# Altium PCB BetaBake_REV_1.0.PcbDoc (part 8 of 8)
Units mil, origin at the board's own origin, x right, y up, seen from the top; angles counter-clockwise.
Board outline 6000 x 4000 mil, 8 copper layers (USB 2.0 (90 Diff) DDR3 Data (50-100), GND (Top Layer high-speed return paths), DDR3 Fly-by Routing (Address, Command, Control), QSPI Flash (Clk, IO), Int4 PWR, Int5 GND (Shielding between L4 and L6), Int6 eMMC High-Speed Data Lines (8-bit bus), SDIO/peripherals, Int7 GND, Escapes, non-critical tracks, decoupling capacitor vias), stack 60.424 mil thick; 426 components, 331 nets, 1941 pads, 428 vias.
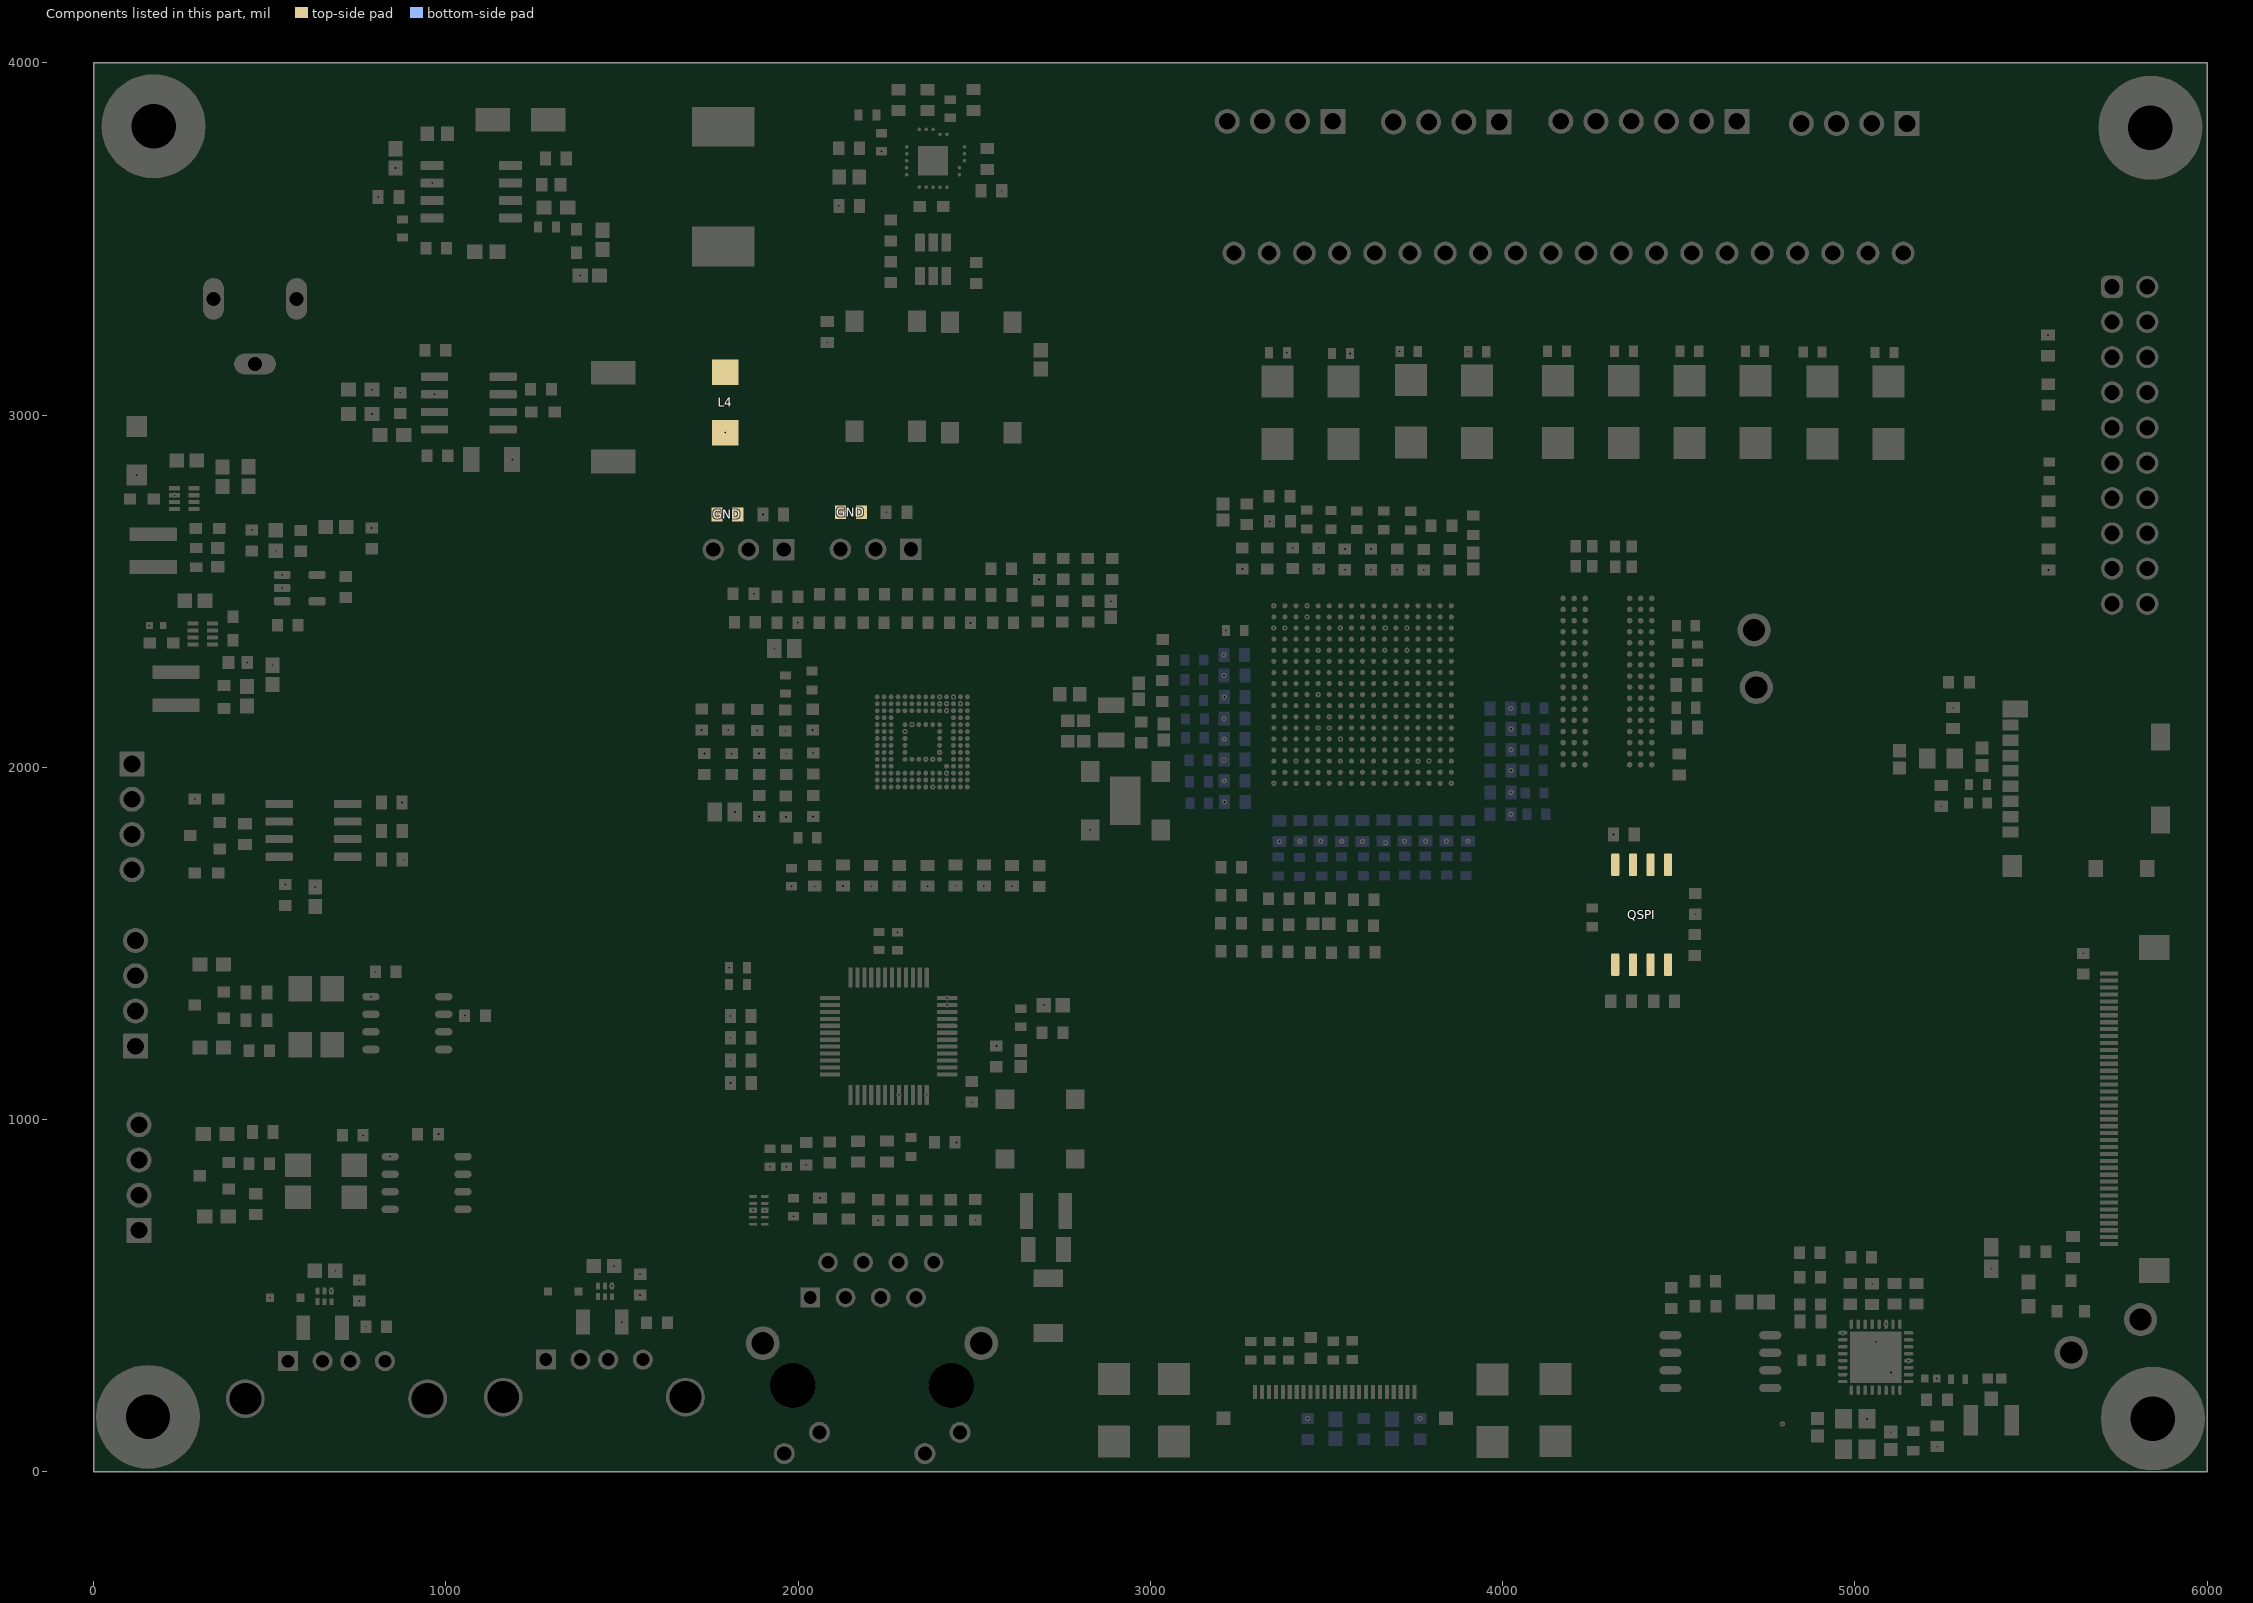
[diagram p13: the components of this part, seen from the top]

## Polygon pours and split planes (outlines as drawn) (continued)
DRAM_1V35 on Int4 PWR "DRAM_1V35_L04_P064" (solid, remove dead copper, pour order 64): 768.02,2833.3 784.02,2817.3 784.02,2739.47 856.86,2739.47 865.02,2731.3 865.02,2653.3 773.31,2653.3 708.16,2588.15 433.17,2588.15 432.02,2589.3 432.02,2512.3 65.01,2512.3 60.01,2517.3 60.01,2877.62 158.44,2877.62 158.44,2796.96 134.82,2773.34 138.02,2770.13 138.02,2597.3 139.61,2598.89 378.02,2598.89 378.02,2609.3 401.43,2632.71 677.43,2632.71 688.02,2643.3 688.02,2765.3 687.02,2766.3 685.72,2765 332.28,2765 332.28,2830.56 335.02,2833.3
AVDD on Int4 PWR "AVDD_L04_P061" (solid, remove dead copper, pour order 61): 3324,291.92 3868,296 3868,75.3 3854.7,62 3324,62
NVCC_CSI on Int4 PWR "NVCC_CSI_L04_P060" (solid, remove dead copper, pour order 60): 2135,3821 2080.04,3821 2619,3821 2619,3559 2614.63,3554.63 2080.04,3554.63 2080.04,3808.04 2080.04,3821
NVCC_CSI on Int4 PWR "NVCC_CSI_L04_P053" (solid, remove dead copper, pour order 53): 469,2504.33 469,2567 476,2574 561,2574 575,2560 575,2445 574.28,2445 551,2421.72 551,2357 486,2357 480,2363 480,2461 393.73,2461 309.73,2377 227.92,2377 227.92,2501.25
VDD_OTG2_VBUS on Int4 PWR "VDD_OTG2_VBUS_L04_P058" (solid, remove dead copper, pour order 58): 654.96,617 789.92,617 823.92,583 823.92,519 807.92,503 692.08,503 654.96,540.12
VDD_OTG1_VBUS on Int4 PWR "VDD_OTG1_VBUS_L04_P057" (solid, remove dead copper, pour order 57): 1631,628 1631,526 1512,526 1483.96,554.04 1449,554.04 1449,623 1454,628
NVCC_CSI on Int4 PWR "NVCC_CSI_L04_P055" (solid, remove dead copper, pour order 55): 243,1954 244,1953 931,1953 931,1439.32 849,1357.32 849,953 931,871 931,717 879,665 691,665 642,714 642,1087 723,1168 723,1591 673.45,1640.55 246.54,1640.55 243,1644.09
Vin on Int4 PWR "VIN_L04_P014" (solid, remove dead copper, pour order 14): 482.28,3740.16 1033.46,3740.16 1033.46,2962.6 482.28,2962.6
VDD_SOC_IN on Int4 PWR "VDD_SOC_IN_L04_P052" (solid, remove dead copper, pour order 52): 125,2422 174.43,2422 177.68,2418.75 177.68,2381.32 193,2366 193,2327 356.28,2327 356.28,2272 409.95,2272 409.95,2327 549,2327 549,2258 544.42,2262.58 406.75,2262.58 406.75,2202 464.65,2202 464.65,2136 151,2136 151,2205 398.15,2200 398.15,2248.98 261.34,2312 125,2312
DRAM_1V35 on Int4 PWR "DRAM_1V35_L04_P020" (solid, remove dead copper, pour order 20): 2644,2560 2840,2560 2853.7,2546.3 2853.7,2507.95 2925.05,2507.95 2931,2502 2931,2457 2922.66,2448.66 2662.62,2448.66 2644,2467.28
VCCQ_1V8 on Int4 PWR "VCCQ_1V8_L04_P025" (solid, remove dead copper, pour order 25): 1963.28,1688 2631.64,1686.36 2636,1686.35 2636,1627 1955,1627 1955,1679.72
AVDD on Int4 PWR "AVDD_L04_P029" (solid, remove dead copper, pour order 29): 1836.86,1333.54 1837.33,1333.06 1837.33,1064.8 1772.37,1064.8 1778.22,1070.65 1778.22,1333.54
Vout on Int4 PWR "VOUT_L04_P038" (solid, remove dead copper, pour order 38): 661.42,468 1664,468 1664,362.2 661.42,362.2
VDD_SOC_IN on Int4 PWR "VDD_SOC_IN_L04_P044" (solid, remove dead copper, pour order 44): 3555.12,2255.91 3622.05,2255.91 3622.05,2153.18 3555,2153.18 3555,2255.79
GND on USB 2.0 (90 Diff) DDR3 Data (50-100) "GND_L01_P070" (solid, pour order 70): 25,3970 6000,3970 6000,0 -26,0 17,43 17,3975
GND on Escapes, non-critical tracks, decoupling capacitor vias "GND_L08_P074" (solid, pour order 74): 25,3970 5975,3970 5975,27 5961,41 17.83,41 17.83,3962.83
GND on Int5 GND (Shielding between L4 and L6) "GND_L05_P084" (solid, remove dead copper, pour order 84): 25,3975 5975,3975 6000,3950 5975,3925 5975,50 25,50 25,4000
GND on Int6 eMMC High-Speed Data Lines (8-bit bus), SDIO/peripherals "GND_L06_P085" (solid, pour order 85): 5950,3975 5961,3964 5961,41 16,41 -25,0 -25,3975
GND on DDR3 Fly-by Routing (Address, Command, Control), QSPI Flash (Clk, IO) "GND_L03_P086" (solid, pour order 86): 0,3975 5950,3975 6000,3925 6000,0 25,0 -25,50 0,75 0,4000
GND on Int7 GND (split plane): 5979.9,20.1 20.1,20.1 20.1,3979.9 5979.9,3979.9
GND on GND (Top Layer high-speed return paths) (split plane): 5979.9,20.1 20.1,20.1 20.1,3979.9 5979.9,3979.9

## Silkscreen, mask and mechanical layers (free items; w line width, h text height)
Top Overlay:
  text "SDA2" at 3295,3677 h40 r270
  text "SCLK" at 4263,3677 h40 r270
  text "CS0" at 4363,3677 h40 r270
  text "MOSI" at 4466,3677 h40 r270
  text "MISO" at 4563,3676 h40 r270
  text "SCL2" at 3414,3674 h40 r270
  text "SDA1" at 3774,3674 h40 r270
  text "SCL1" at 3897,3673 h40 r270
  text "3V3" at 3515,3670 h40 r270
  text "3V3" at 4678,3670 h40 r270
  text "3V3" at 3987,3667 h40 r270
  text "GND" at 3206,3666 h40 r270
  text "TX" at 4928,3666 h40 r270
  text "GND" at 3670,3665 h40 r270
  text "GND" at 4140,3665 h40 r270
  text "GND" at 4813,3662 h40 r270
  text "3V3" at 5146,3661 h40 r270
  text "RX" at 5039,3660 h40 r270
  text "SCL2" at 3608,3393 h40 r270
  text "SDA1" at 3905,3391 h40 r270
  text "SCL1" at 4007,3391 h40 r270
  text "MISO" at 4614,3391 h40 r270
  text "RX" at 5021,3391 h40 r270
  text "SDA2" at 3505,3390 h40 r270
  text "SCLK" at 4310,3390 h40 r270
  text "CS0" at 4414,3390 h40 r270
  text "MOSI" at 4514,3390 h40 r270
  text "TX" at 4913,3390 h40 r270
  text "GND" at 3319,3388 h40 r270
  text "GND" at 4822,3388 h40 r270
  text "3V3" at 5128,3387 h40 r270
  text "3V3" at 3718,3386 h40 r270
  text "GND" at 3424,3385 h40 r270
  text "GND" at 3817,3385 h40 r270
  text "GND" at 4221,3385 h40 r270
  text "3V3" at 4722,3384 h40 r270
  text "GND" at 3214,3383 h40 r270
  text "GND" at 3212,3381 h40 r270
  text "3V3" at 4120,3378 h40 r270
Bottom Overlay:
  drawing of 483 lines, arcs and shapes, not listed
  text "SIG_A" at 308,1983 h30
  text "SIG_B" at 300,1879 h30
  text "GND" at 287,1791 h30
  text "GND" at 286.54,1682.28 h30
  text "GND" at 284,1484 h30
  text "GND" at 284,1382 h30
  text "LOW" at 282,1281 h30
  text "HIGH" at 286,1179 h30
  text "GND" at 278.78,958.78 h30
  text "GND" at 279,859 h30
  text "LOW" at 289,761 h30
  text "HIGH" at 293,661 h30
  text "BetaBak REV 1.0 / i.MX6ULL INDUSTRIAL SBC / HW DESIGN: AYOUB ELBOUHI / ENSA MARRAKECH - UCA / 10-2026" at 6006.97,585 h100

## Text inside footprints (layer, text, board x,y; h text height)
ETHENET: Top 3D Body "9" at 1909.11,94.54 h32.04 r180; Top 3D Body "10" at 2009.27,144.62 h32.04 r180; Top 3D Body "11" at 2309.51,94.74 h32 r180; Top 3D Body "12" at 2409.63,144.68 h32.02 r180; Top 3D Body "1" at 2009.14,470.15 h32.06 r180; Top 3D Body "3" at 2109.4,469.96 h32.03 r180; Top 3D Body "5" at 2209.5,469.95 h32.03 r180; Top 3D Body "7" at 2309.69,470.16 h32.06 r180; Top 3D Body "8" at 2359.8,570.38 h32.06 r180; Top 3D Body "6" at 2259.56,570.13 h32.04 r180; Top 3D Body "4" at 2159.43,570.25 h32.05 r180; Top 3D Body "2" at 2059.39,569.98 h32.02 r180; Top 3D Body "LEFT" at 2009.12,-143.5 h24.05 r180; Top 3D Body "RIGHT" at 2497.35,-143.22 h24.03 r180; Top 3D Body "FRONT" at 2272.09,-18.13 h32.05 r180
MCIMX6Y2DVM08AB: Top Overlay "17" at 3401.33,2090.18 h1 r270; Top Overlay "1" at 3829.21,1905.99 h50 r270; Top Overlay "U" at 3927.74,2483.46 h50 r180; Top Overlay "A" at 3927.74,1979.52 h50 r180; Top 3D Body "17" at 3611.44,2176.82 h50 r270; Top 3D Body "1" at 3829.21,1905.99 h50 r270; Top 3D Body "U" at 3927.74,2483.46 h50 r180; Top 3D Body "A" at 3927.74,1979.52 h50 r180; Bottom Overlay "17" at 3430.39,1867.26 h50 r90; Bottom Overlay "1" at 3879.21,1905.99 h50 r90; Bottom Overlay "U" at 3902.74,2483.46 h50 r180; Bottom Overlay "A" at 3902.74,1979.52 h50 r180
SD_CARD: Top 3D Body "*" at 5417,1939 h50 r270
Y2: Top Overlay "REFDES" at 2662,1060.24 h50 r270; Top Overlay "RefDes" at 2662,1047.74 h50 r270; Top 3D Body "RefDes2" at 2662,1060.24 h50 r270